# Altium PCB DATALOGER_RevA.PcbDoc (part 2 of 3)
Units mil, origin at the board's own origin, x right, y up, seen from the top; angles counter-clockwise.
Board outline 3937.01 x 3149.61 mil, 2 copper layers (Top Layer, Bottom Layer), stack 62.19 mil thick; 129 components, 81 nets, 422 pads, 180 vias.
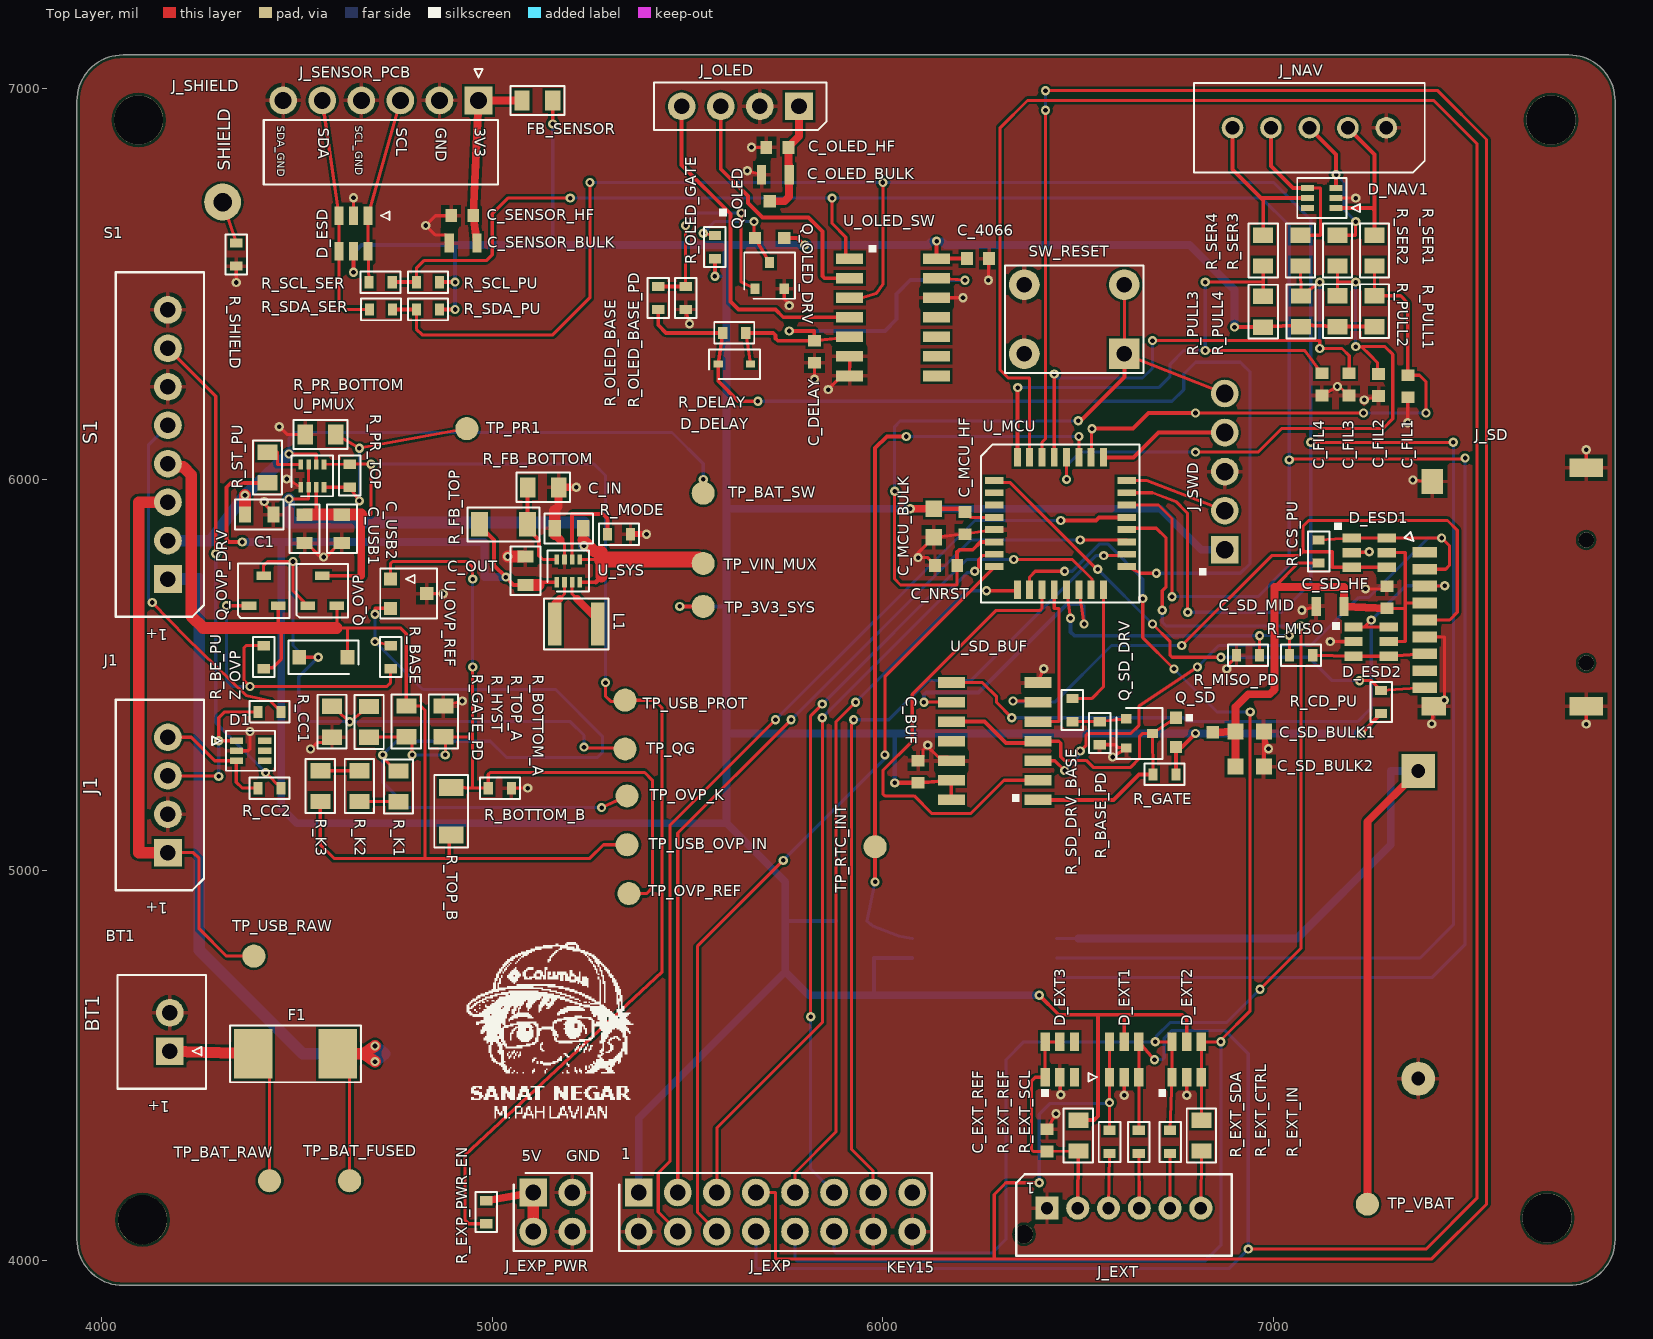
[diagram p0: Top Layer view]

## Via types
v1: diameter 23.62, hole 11.81, Top Layer to Bottom Layer, 180 vias

## Nets (pads, with @x,y where several pads share a name; then routed paths per layer and width w, separated by ;. In a path a pad name is that pad's centre, name@x,y a point inside that pad or via, vN(x,y) a via of type N, cw(c..) or ccw(c..) an arc to the next point about the centre after c; other vN are vias at no path point)
3V3_REF: C_EXT_REF.1 D_EXT3.1 D_EXT3.5 D_EXT3.6 J_EXT.2 R_EXT_REF.2 | length 610.6
  Top Layer w8: D_EXT3.5@6452.6,4560.55 D_EXT3.6@6415.2,4560.55 D_EXT3.1@6415.2,4470 6390,4470 6380,4460 6380,4285 6385,4280 C_EXT_REF.1@6420,4280 R_EXT_REF.2@6500,4281.26 J_EXT.2@6498.74,4135